# Altium PCB ASCII-v2.0.PcbDoc (part 3 of 5)
Units mil, origin at the board's own origin, x right, y up, seen from the top; angles counter-clockwise.
Board outline 1968.5 x 4921.26 mil, 4 copper layers (Top Layer, Layer 1, Layer 2, Bottom Layer), stack 62.45 mil thick; 272 components, 175 nets, 1155 pads, 394 vias.
Unrouted connection lines stored in the file: 146.
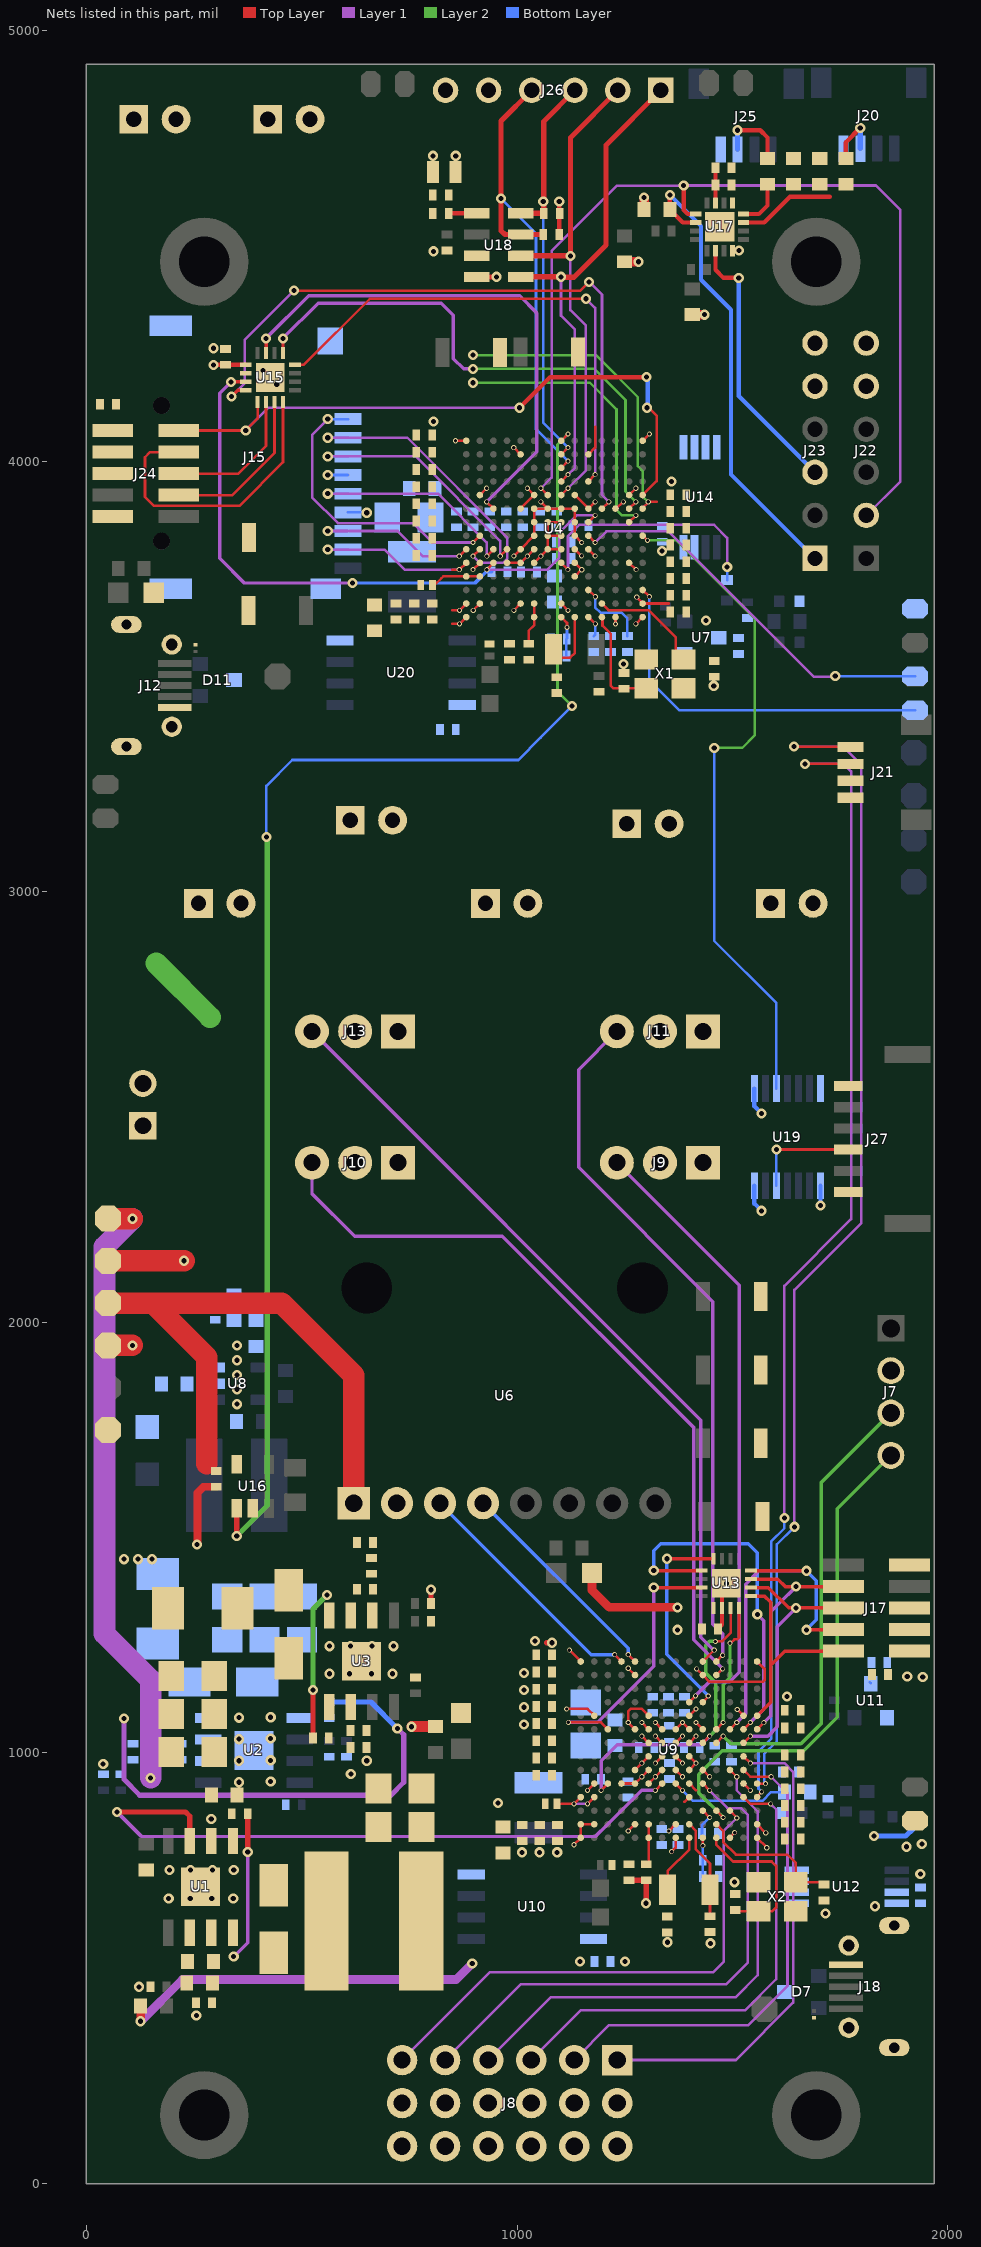
[diagram p4: the nets of this part, all layers, seen from the top]

## Part data (continued)
L3: library part SRN8040-1R0Y, "7.8A 1uH ±30% 11A SMD,7.9x8.2mm Power Inductors ROHS", LCSC Part Number=C2041438, Manufacturer=BOURNS, ComponentLink1Description=LCSC, ComponentLink1URL=https://www.lcsc.com/product-detail/Power-Inductors_BOURNS-SRN8040-1R0Y_C2041438.html, Manufacturer Part Number=SRN8040-1R0Y
L4: library part SMTDR54-120M, "1.4A 12uH ±20% SMD,5.2x5.8mm Power Inductors ROHS", LCSC Part Number=C326234, Manufacturer="3L COILS", ComponentLink1Description=LCSC, ComponentLink1URL=https://www.lcsc.com/product-detail/Power-Inductors_3L-COILS-SMTDR54-120M_C326234.html, Manufacturer Part Number=SMTDR54-120M
L5 L6: library part DFE322512F-4R7M=P2, "FIXED IND 4.7UH 1.6A 157MOHM SMD", LCSC Part Number=C703083, Manufacturer=Murata, Manufacturer Part Number=DFE322512F-4R7M=P2, Supplier Part Number 1=490-DFE322512F-4R7M=P2CT-ND, Category="Fixed Inductors", Item Type=Inductor, Pricing 1="1=0.61, 10=0.533, 25=0.4952, 50=0.4188, 100=0.3808, 250=0.35792, 500=0.31984, 1000=0.25892 (USD)", RoHS=Yes, RoHS Compliant=Yes, Stock 1=4687, Supplier 1=Digi-Key
LED1: "LED BLUE CLEAR 0805 SMD", Case Code (Imperial)=0805, Case Code (Metric)=2012, Color=Blue, Forward Current=30mA, Forward Voltage=3.2V, Lens Color=Colorless, Manufacturer="Wurth Electronics", Max Operating Temperature=85°C, Max Reverse Voltage (DC)=5V, Min Operating Temperature=-40°C, Package Quantity=1, Power Dissipation=105mW, Supplier Part Number=732-4982-1-ND, Test Current=20mA, Case/Package=0805, ComponentLink1Description=https://datasheet.ciiva.com/22656/1740214-22656954.pdf?src-supplier=Element14, ComponentLink1URL=https://datasheet.ciiva.com/22656/1740214-22656954.pdf?src-supplier=Element14, ComponentLink2Description=https://datasheet.ciiva.com/23843/150080bs75000-23843251.pdf?src-supplier=Newark, ComponentLink2URL=https://datasheet.ciiva.com/23843/150080bs75000-23843251.pdf?src-supplier=Newark, ComponentLink3Description=https://datasheet.ciiva.com/29279/759433-da-01-en-chipled-0805-w-kl-blau-150080bs75000-29279203.pdf?src-supplier=Conrad, ComponentLink3URL=https://datasheet.ciiva.com/29279/759433-da-01-en-chipled-0805-w-kl-blau-150080bs75000-29279203.pdf?src-supplier=Conrad, ComponentLink4Description=https://datasheet.ciiva.com/29562/150080bs75000-29562923.pdf?src-supplier=Digikey, ComponentLink4URL=https://datasheet.ciiva.com/29562/150080bs75000-29562923.pdf?src-supplier=Digikey, ComponentLink5Description=https://datasheet.ciiva.com/29562/150080bs75000-29562922.pdf?src-supplier=Digikey, ComponentLink5URL=https://datasheet.ciiva.com/29562/150080bs75000-29562922.pdf?src-supplier=Digikey, Dominant Wavelength=470nm, Height=0.8mm, Item Type=LEDs, Lead Free="Lead Free", Length=2mm, Lens Size=1.25mm, Lens Style=Clear,Flat,Rectangular, Lens Transparency=Clear, Luminous Intensity=145mcd, Manufacturer Part Number=150080BS75000, Mounting Technology="Surface Mount", Packaging="Cut Tape", Pricing="1=0.18, 50=0.176, 100=0.151, 500=0.131 (USD)", Reach SVHC Compliant=Unknown, Reverse Voltage=5V, RoHS=Yes, RoHS Compliant=Yes, Series=WL-SMCW, Stock=93649, Supplier=Digikey, Viewing Angle=140°, Wavelength=470nm, Width=1.25mm
LED2 LED3: library part XL-2012UOC, "Colorless transparence -30℃~+85℃ 601nm~603nm Positive post Orange 120° 55mW 0805 Light Emitting Diodes (LED) ROHS", LCSC Part no=C965813, Manufacturer=XINGLIGHT, Package=0805, Manufacture Part No=XL-2012UOC
R1: library part RT0603BRE07270RL, "RES SMD 270 OHM 0.1% 1/10W 0603", Case/Package=0603, LCSC Part Number=C705836, Manufacturer=Yageo, Max Operating Temperature=125°C, Max Power Dissipation=100mW, Min Operating Temperature=-55°C, Package Quantity=5000, Resistor Type="Thin Film", Supplier Part Number 1=RT0603BRE07270RL-ND, Temperature Coefficient=50ppm/°C, Tolerance=0.1%, Voltage Rating (DC)=50V, Category="Chip SMD Resistors", ComponentLink1Description=https://datasheet.ciiva.com/2584/pyu-rt-1-to-0-05-rohs-l-5-2584379.pdf?src-supplier=Digi-Key, ComponentLink1URL=https://datasheet.ciiva.com/2584/pyu-rt-1-to-0-05-rohs-l-5-2584379.pdf?src-supplier=Digi-Key, Construction=Rectangular, Depth=0.8mm, Height=0.022inch, Item Type=Resistor, Lead Free="Lead Free", Length=0.063inch, Manufacturer Part Number=RT0603BRE07270RL, Military Standard=Not, Number of Terminations=2, Packaging="Tape and Reel", Pricing 1="5000=0.04770 (USD)", Resistance=270R, RoHS=Yes, RoHS Compliant=Yes, Series=RT, Supplier 1=Digi-Key, Width=0.031inch
R2: library part CR0402FF1153G, "62.5mW Thick Film Resistors 50V ±1% ±200ppm/℃ 115kΩ 0402 Chip Resistor - Surface Mount ROHS", LCSC Part Number=C100215, Manufacturer="LIZ Elec", Package=0402, ComponentLink1Description=LCSC, ComponentLink1URL=https://www.lcsc.com/product-detail/Chip-Resistor-Surface-Mount_LIZ-Elec-CR0402FF1153G_C100215.html, Item Type=Resistor, Manufacturer Part Number=CR0402FF1153G
R3: library part NQ02WGF2872TCE, "62.5mW 100V ±1% 28.7kΩ 0402 Chip Resistor - Surface Mount ROHS", LCSC Part Number=C2779810, Manufacturer="Royal Ohm", Supplier Part Number=303-NQ02WGF2872TCE, Item Type=Resistor, Manufacturer Part Number=NQ02WGF2872TCE, Pricing="10000=0.002 (USD)", Supplier=Mouser
R4: library part RTT021053FTH, "62.5mW Thick Film Resistors 50V ±100ppm/℃ ±1% 105kΩ 0402 Chip Resistor - Surface Mount ROHS", LCSC Part Number=C102762, Manufacturer=RALEC, Package=0402, ComponentLink1Description=LCSC, ComponentLink1URL=https://www.lcsc.com/product-detail/Chip-Resistor-Surface-Mount_RALEC-RTT021053FTH_C102762.html, Item Type=Resistor, Manufacturer Part Number=RTT021053FTH
R5: library part RT0402BRD0712K1L, "RES SMD 12.1KOHM 0.1% 1/16W 0402", LCSC Part Number=C281773, Manufacturer=Yageo, Supplier Part Number=2068365, Category="Chip SMD Resistors", ComponentLink1Description=https://datasheet.ciiva.com/12812/pyu-rt-1-to-0-05-rohs-l-4-12812462.pdf?src-supplier=Mouser, ComponentLink1URL=https://datasheet.ciiva.com/12812/pyu-rt-1-to-0-05-rohs-l-4-12812462.pdf?src-supplier=Mouser, Item Type=Resistor, Manufacturer Part Number=RT0402BRD0712K1L, Pricing="10000=0.0245, 20000=0.0217, 30000=0.0237, 50000=0.0233, 100000=0.0228, 200000=0.022 (USD)", RoHS=Yes, Stock=60000, Supplier="Future Electronics"
R6: library part SCR0402F60K4, "60.4kΩ 50V 62.5mW Thick Film Resistors ±1% 0402 Chip Resistor - Surface Mount ROHS", LCSC Part Number=C3016055, Manufacturer=VO, Package=0402, ComponentLink1Description=LCSC, ComponentLink1URL=https://www.lcsc.com/product-detail/Chip-Resistor-Surface-Mount_VO-SCR0402F60K4_C3016055.html, Item Type=Resistor, Manufacturer Part Number=SCR0402F60K4
R7: library part RT0402BRD0723K7L, "RES SMD 23.7KOHM 0.1% 1/16W 0402", LCSC Part Number=C852656, Manufacturer=Yageo, Supplier Part Number=YAG4212CT-ND, Voltage Rating (DC)=50V, Category="Chip SMD Resistors", ComponentLink1Description=https://datasheet.ciiva.com/2582/pyu-rt-1-to-0-05-rohs-l-5-2582244.pdf?src-supplier=Digikey, ComponentLink1URL=https://datasheet.ciiva.com/2582/pyu-rt-1-to-0-05-rohs-l-5-2582244.pdf?src-supplier=Digikey, ComponentLink2Description=https://datasheet.ciiva.com/12725/pyu-rt-1-to-0-05-rohs-l-4-12725336.pdf?src-supplier=Mouser, ComponentLink2URL=https://datasheet.ciiva.com/12725/pyu-rt-1-to-0-05-rohs-l-4-12725336.pdf?src-supplier=Mouser, Item Type=Resistor, Manufacturer Part Number=RT0402BRD0723K7L, Pricing="1=0.16, 10=0.121, 50=0.0958, 100=0.0859, 500=0.0654, 1000=0.0578, 5000=0.04283 (USD)", RoHS=Yes, Stock=28530, Supplier=Digikey
R8: library part CRCW040280K6FKED, "RES SMD 80.6K OHM 1% 1/16W 0402", LCSC Part Number=C2076816, Manufacturer="Vishay Intertech", Package=Res-0402, Item Type=Resistor, Manufacturer Part Number=CRCW040280K6FKED
R9 R20: library part FRC0402F1152TS, "11.5kΩ 50V 62.5mW Thick Film Resistors ±100ppm/℃ ±1%  0402 Chip Resistor - Surface Mount ROHS", LCSC Part Number=C2933068, Manufacturer=FOJAN, Package=0402, ComponentLink1Description=LCSC, ComponentLink1URL=https://www.lcsc.com/product-detail/Chip-Resistor-Surface-Mount_FOJAN-FRC0402F1152TS_C2933068.html, Item Type=Resistor, Manufacturer Part Number=FRC0402F1152TS
R10 R11 R14 R15 R23 R24 R27 R29: library part RC0402FR-07100KL, "RES 100K OHM 1% 1/16W 0402", Case Code (Imperial)=0402, Case Code (Metric)=1005, LCSC Part Number=C60491, Manufacturer=Yageo, Max Operating Temperature=155°C, Max Power Dissipation=63mW, Min Operating Temperature=-55°C, Package Quantity=1, Resistance=100kR, Resistance Tolerance=1%, Resistor Type="Thick Film", Supplier Part Number 1=603-RC0402FR-07100KL, Temperature Coefficient=100ppm/°C, Voltage Rating=50V, Case/Package=0402, Category="Chip SMD Resistors", ComponentLink1Description=https://datasheet.ciiva.com/11819/0900766b80c66297-11819452.pdf?src-supplier=RSComponents, ComponentLink1URL=https://datasheet.ciiva.com/11819/0900766b80c66297-11819452.pdf?src-supplier=RSComponents, ComponentLink2Description=https://datasheet.ciiva.com/22747/1018594-22747509.pdf?src-supplier=Element14, ComponentLink2URL=https://datasheet.ciiva.com/22747/1018594-22747509.pdf?src-supplier=Element14, ComponentLink3Description=https://datasheet.ciiva.com/2453/pyu-r-int-thick-7-2453362.pdf?src-supplier=Digi-Key, ComponentLink3URL=https://datasheet.ciiva.com/2453/pyu-r-int-thick-7-2453362.pdf?src-supplier=Digi-Key, ComponentLink4Description=https://datasheet.ciiva.com/2453/pyu-r-int-thick-7-2453363.pdf?src-supplier=Digi-Key, ComponentLink4URL=https://datasheet.ciiva.com/2453/pyu-r-int-thick-7-2453363.pdf?src-supplier=Digi-Key, ComponentLink5Description=https://datasheet.ciiva.com/2453/pyu-r-int-thick-7-2453361.pdf?src-supplier=Digi-Key, ComponentLink5URL=https://datasheet.ciiva.com/2453/pyu-r-int-thick-7-2453361.pdf?src-supplier=Digi-Key, ComponentLink6Description=https://datasheet.ciiva.com/12667/pyu-rc0402-51-rohs-l-6-r-12667930.pdf?src-supplier=Mouser, ComponentLink6URL=https://datasheet.ciiva.com/12667/pyu-rc0402-51-rohs-l-6-r-12667930.pdf?src-supplier=Mouser, ComponentLink7Description=https://datasheet.ciiva.com/15189/getdatasheetpartid-323696-15189334.pdf?src-supplier=Verical, ComponentLink7URL=https://datasheet.ciiva.com/15189/getdatasheetpartid-323696-15189334.pdf?src-supplier=Verical, Construction=Rectangular, Depth=0.5mm, Features="Moisture Resistant", Height=0.016inch, Item Type=Resistor, Lead Free="Lead Free", Length=0.039inch, Manufacturer Part Number=RC0402FR-07100KL, Military Standard=Not, Number of Terminations=2, Packaging="Tape and Reel", Power Rating=63mW, Pricing 1="1=0.10000, 10=0.01200, 50=0.01200, 100=0.00500, 1000=0.00300, 2500=0.00200, 10000=0.00100 (USD)", REACH SVHC="No SVHC", RoHS=Yes, RoHS Compliant=Yes, Series=RC, Stock 1=7759549, Supplier 1=Mouser, Technology="THICK FILM", Termination=SMD/SMT, Tolerance=1%, Width=0.02inch, Working Voltage=50V
R12 R25: library part RC0603FR-071KL, "RES SMD 1K OHM 1% 1/10W 0603", Case Code (Imperial)=0603, Case Code (Metric)=1608, LCSC Part Number=C22548, Manufacturer=Yageo, Max Operating Temperature=155°C, Min Operating Temperature=-55°C, Power Rating=100mW, Resistance=1kR, Supplier Part Number 1=311-1.00KHRDKR-ND, Temperature Coefficient=100ppm/°C, Tolerance=1%, Voltage Rating=50V, Case/Package=0603, ComponentLink1Description=https://www.verical.com/server-webapp/html/getDatasheet?partID=409289&src-supplier=Verical, ComponentLink1URL=https://www.verical.com/server-webapp/html/getDatasheet?partID=409289&src-supplier=Verical, ComponentLink2Description=http://documents.rs-components.com/techlib://itc_doclist_GB.htm?stockno=5048928&src-supplier=RSComponents, ComponentLink2URL=http://documents.rs-components.com/techlib://itc_doclist_GB.htm?stockno=5048928&src-supplier=RSComponents, ComponentLink3Description=http://www.yageo.com/documents/recent/PYu-RC0603_51_RoHS_L_4.pdf?src-supplier=Avnet+Europe, ComponentLink3URL=http://www.yageo.com/documents/recent/PYu-RC0603_51_RoHS_L_4.pdf?src-supplier=Avnet+Europe, ComponentLink4Description=http://www.farnell.com/datasheets/2167052.pdf?src-supplier=Element14, ComponentLink4URL=http://www.farnell.com/datasheets/2167052.pdf?src-supplier=Element14, ComponentLink5Description=http://www.farnell.com/datasheets/1868787.pdf?src-supplier=Element14, ComponentLink5URL=http://www.farnell.com/datasheets/1868787.pdf?src-supplier=Element14, ComponentLink6Description=http://www.yageo.com/documents/recent/PYu-RC_Group_51_RoHS_L_2.pdf?src-supplier=Avnet, ComponentLink6URL=http://www.yageo.com/documents/recent/PYu-RC_Group_51_RoHS_L_2.pdf?src-supplier=Avnet, ComponentLink7Description=https://www.verical.com/server-webapp/html/getDatasheet?partID=404327&src-supplier=Verical, ComponentLink7URL=https://www.verical.com/server-webapp/html/getDatasheet?partID=404327&src-supplier=Verical, ComponentLink8Description=http://www.farnell.com/datasheets/443971.pdf?src-supplier=Element14, ComponentLink8URL=http://www.farnell.com/datasheets/443971.pdf?src-supplier=Element14, Composition="Thick Film", Contact Plating=Tin,Matte, Depth=0.8mm, Height=0.45mm, Item Type=Resistor, Lead Free="Lead Free", Length=1.6mm, Manufacturer Part Number=RC0603FR-071KL, Military Standard=Not, Packaging="Tape and Reel", Pricing 1="1=0.1, 10=0.023, 100=0.0094, 1000=0.0042, 2500=0.0037 (USD)", Radiation Hardening=No, REACH SVHC="No SVHC", Stock 1=21472395, Supplier 1=Digi-Key, Termination=SMD/SMT
R13 R26: library part RC0603FR-07130RL, "RES 130 OHM 1% 1/10W 0603", Case Code (Imperial)=0603, Case Code (Metric)=1608, LCSC Part Number=C141677, Manufacturer=Yageo, Max Operating Temperature=155°C, Max Power Dissipation=100mW, Min Operating Temperature=-55°C, Resistance Tolerance=1%, Resistor Type="Thick Film", Supplier Part Number 1=1846773, Temperature Coefficient=100ppm/°C, Voltage Rating=75V, Voltage Rating (DC)=50V, Case/Package=0603, Category="Chip SMD Resistors", ComponentLink1Description=https://datasheet.ciiva.com/46395/443971-46395023.pdf?src-supplier=Element14, ComponentLink1URL=https://datasheet.ciiva.com/46395/443971-46395023.pdf?src-supplier=Element14, ComponentLink2Description=https://datasheet.ciiva.com/2553/pyu-r-int-thick-7-2553516.pdf?src-supplier=Digi-Key, ComponentLink2URL=https://datasheet.ciiva.com/2553/pyu-r-int-thick-7-2553516.pdf?src-supplier=Digi-Key, ComponentLink3Description=https://datasheet.ciiva.com/2553/pyu-r-int-thick-7-2553517.pdf?src-supplier=Digi-Key, ComponentLink3URL=https://datasheet.ciiva.com/2553/pyu-r-int-thick-7-2553517.pdf?src-supplier=Digi-Key, ComponentLink4Description=https://datasheet.ciiva.com/2553/pyu-r-int-thick-7-2553515.pdf?src-supplier=Digi-Key, ComponentLink4URL=https://datasheet.ciiva.com/2553/pyu-r-int-thick-7-2553515.pdf?src-supplier=Digi-Key, Construction=Rectangular, Depth=0.8mm, Features="Moisture Resistant", Height=0.45mm, Item Type=Resistor, Lead Free="Lead Free", Length=1.6mm, Manufacturer Part Number=RC0603FR-07130RL, Military Standard=Not, Number of Terminations=2, Packaging="Tape and Reel", Pins=2, Power Rating=100mW, Pricing 1="5000=0.0014, 75000=0.0013, 200000=0.0013, 750000=0.0012, 2000000=0.0011 (USD)", Reach SVHC Compliant=No, RoHS=Yes, RoHS Compliant=Yes, Series=RC, Stock 1=630000, Supplier 1="Future Electronics", Termination=SMD/SMT, Tolerance=1%, Weight=7.1E-05oz, Width=0.8mm
R16: library part RLM10FTSMR006, "500mW 6mΩ ±50ppm/℃ ±1% 0805 Current Sense Resistors / Shunt Resistors ROHS", LCSC Part Number=C163092, Manufacturer="TA-I Tech", Package=0805, ComponentLink1Description=LCSC, ComponentLink1URL=https://www.lcsc.com/product-detail/Current-Sense-Resistors-Shunt-Resistors_TA-I-Tech-RLM10FTSMR006_C163092.html, Item Type=Resistor, Manufacturer Part Number=RLM10FTSMR006
R17: library part RC0603FR-0736K5L, "RES 36.5K OHM 1% 1/10W 0603", LCSC Part Number=C137738, Manufacturer=YAGEO, Package=0603, ComponentLink1Description=LCSC, ComponentLink1URL=https://www.lcsc.com/product-detail/Chip-Resistor-Surface-Mount_YAGEO-RC0603FR-0736K5L_C137738.html, Item Type=Resistor, Manufacturer Part Number=RC0603FR-0736K5L
R18: library part RC0603FR-0715K4L, "RES 15.4K OHM 1% 1/10W 0603", LCSC Part Number=C185370, Manufacturer=Yageo, Voltage Rating (DC)=50V, ComponentLink1Description=https://datasheet.ciiva.com/15159/getdatasheetpartid-28826-15159212.pdf?src-supplier=Verical, ComponentLink1URL=https://datasheet.ciiva.com/15159/getdatasheetpartid-28826-15159212.pdf?src-supplier=Verical, ComponentLink2Description=https://datasheet.ciiva.com/11808/0900766b80f96399-11808544.pdf?src-supplier=Rs, ComponentLink2URL=https://datasheet.ciiva.com/11808/0900766b80f96399-11808544.pdf?src-supplier=Rs, ComponentLink3Description=https://datasheet.ciiva.com/2454/pyu-r-int-thick-7-2454348.pdf?src-supplier=Digikey, ComponentLink3URL=https://datasheet.ciiva.com/2454/pyu-r-int-thick-7-2454348.pdf?src-supplier=Digikey, ComponentLink4Description=https://datasheet.ciiva.com/2454/pyu-r-int-thick-7-2454349.pdf?src-supplier=Digikey, ComponentLink4URL=https://datasheet.ciiva.com/2454/pyu-r-int-thick-7-2454349.pdf?src-supplier=Digikey, ComponentLink5Description=https://datasheet.ciiva.com/2454/pyu-r-int-thick-7-2454350.pdf?src-supplier=Digikey, ComponentLink5URL=https://datasheet.ciiva.com/2454/pyu-r-int-thick-7-2454350.pdf?src-supplier=Digikey, Item Type=Resistors, Lead Free=5697LeadFree, Manufacturer Part Number=RC0603FR-0715K4L, Pricing="5000=0.0022, 50000=0.0021, 150000=0.0021, 375000=0.002, 1000000=0.0019 (USD)", RoHS=Yes, RoHS Compliant=5897YesNo, Stock=230000, Supplier="Future Electronics"
R19: library part RC0603FR-0775KL, "RES 75K OHM 1% 1/10W 0603", Case Code (Imperial)=0603, Case Code (Metric)=1608, LCSC Part Number=C114636, Manufacturer=Yageo, Max Operating Temperature=155°C, Max Power Dissipation=100mW, Min Operating Temperature=-55°C, Resistance Tolerance=1%, Resistor Type="Thick Film", Temperature Coefficient=100ppm/°C, Voltage Rating=50V, Case/Package=0603, ComponentLink1Description=https://datasheet.ciiva.com/11808/0900766b80f96399-11808100.pdf?src-supplier=Rs, ComponentLink1URL=https://datasheet.ciiva.com/11808/0900766b80f96399-11808100.pdf?src-supplier=Rs, ComponentLink2Description=https://datasheet.ciiva.com/15189/getdatasheetpartid-326733-15189816.pdf?src-supplier=Verical, ComponentLink2URL=https://datasheet.ciiva.com/15189/getdatasheetpartid-326733-15189816.pdf?src-supplier=Verical, ComponentLink3Description=https://datasheet.ciiva.com/2455/pyu-r-int-thick-7-2455324.pdf?src-supplier=Digikey, ComponentLink3URL=https://datasheet.ciiva.com/2455/pyu-r-int-thick-7-2455324.pdf?src-supplier=Digikey, ComponentLink4Description=https://datasheet.ciiva.com/2455/pyu-r-int-thick-7-2455325.pdf?src-supplier=Digikey, ComponentLink4URL=https://datasheet.ciiva.com/2455/pyu-r-int-thick-7-2455325.pdf?src-supplier=Digikey, ComponentLink5Description=https://datasheet.ciiva.com/2455/pyu-r-int-thick-7-2455323.pdf?src-supplier=Digikey, ComponentLink5URL=https://datasheet.ciiva.com/2455/pyu-r-int-thick-7-2455323.pdf?src-supplier=Digikey, ComponentLink6Description=https://datasheet.ciiva.com/46395/443971-46395017.pdf?src-supplier=Element14, ComponentLink6URL=https://datasheet.ciiva.com/46395/443971-46395017.pdf?src-supplier=Element14, Construction=Rectangular, Depth=0.8mm, Features="Moisture Resistant", Height=0.45mm, Item Type=Resistor, Lead Free=5697LeadFree, Length=1.6mm, Manufacturer Part Number=RC0603FR-0775KL, Military Standard=Not, Number of Terminations=2, Packaging="Tape and Reel", Pins=2NUMBER, Power Rating=100mW, Pricing="5000=0.0015, 75000=0.0015, 250000=0.0014, 750000=0.0013, 2500000=0.0012 (USD)", Reach SVHC Compliant=No, RoHS=Yes, RoHS Compliant=Yes, Series=RC, Stock=550000, Supplier="Future Electronics", Technology="THICK FILM", Termination=SMD/SMT, Tolerance=1%, Voltage Rating (DC)=50V
R21: library part RC0402DR-07118KL, "RES 118K OHM 0.5% 1/16W 0402", Case/Package=0402, LCSC Part Number=C723573, Manufacturer=Yageo, Max Operating Temperature=155°C, Max Power Dissipation=63mW, Min Operating Temperature=-55°C, Resistance=118kR, Resistor Type="Thick Film", Supplier Part Number 1=603-RC0402DR-07118KL, Temperature Coefficient=100ppm/°C, Tolerance=0.5%, Category="Chip SMD Resistors", ComponentLink1Description=http://www.yageo.com.tw/exep/pages/download/literatures/PYu-R_INT-thick_7.pdf?src-supplier=Digi-Key, ComponentLink1URL=http://www.yageo.com.tw/exep/pages/download/literatures/PYu-R_INT-thick_7.pdf?src-supplier=Digi-Key, Features="Moisture Resistant", Height=0.016inch, Length=0.039inch, Manufacturer Part Number=RC0402DR-07118KL, Number of Terminations=2, Packaging="Tape and Reel", Pricing 1="1=0.21000, 10=0.07000, 50=0.07000, 100=0.02900, 1000=0.01300, 10000=0.01200 (USD)", RoHS=Yes, RoHS Compliant=Yes, Supplier 1=Mouser, Width=0.02inch
R22: library part RT0603BRD0713K3L, "RES SMD 13.3KOHM 0.1% 1/10W 0603", Case Code (Imperial)=0603, Case Code (Metric)=1608, LCSC Part Number=C861117, Manufacturer=Yageo, Max Operating Temperature=125°C, Max Power Dissipation=100mW, Min Operating Temperature=-55°C, Package Quantity=5000, Resistance=13.3kR, Resistor Type="Thin Film", Temperature Coefficient=25ppm/°C, Tolerance=0.1%, Voltage Rating=75V, Voltage Rating (DC)=50V, Case/Package=0603, Category="Chip SMD Resistors", ComponentLink1Description=https://datasheet.ciiva.com/12725/pyu-rt-1-to-0-05-rohs-l-4-12725067.pdf?src-supplier=Mouser, ComponentLink1URL=https://datasheet.ciiva.com/12725/pyu-rt-1-to-0-05-rohs-l-4-12725067.pdf?src-supplier=Mouser, ComponentLink2Description=https://datasheet.ciiva.com/8890/pyu-rt-1-to-0-05-rohs-l-4-8890934.pdf?src-supplier=Avnet, ComponentLink2URL=https://datasheet.ciiva.com/8890/pyu-rt-1-to-0-05-rohs-l-4-8890934.pdf?src-supplier=Avnet, ComponentLink3Description=https://datasheet.ciiva.com/2585/pyu-rt-1-to-0-05-rohs-l-4-2585661.pdf?src-supplier=Digi-Key, ComponentLink3URL=https://datasheet.ciiva.com/2585/pyu-rt-1-to-0-05-rohs-l-4-2585661.pdf?src-supplier=Digi-Key, ComponentLink4Description=https://datasheet.ciiva.com/46635/pyu-rt-1-to-0-05-rohs-l-5-46635007.pdf?src-supplier=Digi-Key, ComponentLink4URL=https://datasheet.ciiva.com/46635/pyu-rt-1-to-0-05-rohs-l-5-46635007.pdf?src-supplier=Digi-Key, Construction=Rectangular, Contact Plating=Tin,Matte, Depth=0.8mm, Features="Moisture Resistant", Height=0.022inch, Item Type=Resistor, Lead Free="Lead Free", Length=0.063inch, Manufacturer Part Number=RT0603BRD0713K3L, Military Standard=Not, Number of Terminations=2, Packaging="Tape and Reel", Power Rating=100mW, Pricing 1="1=0.29220, 10=0.24060, 25=0.23820, 100=0.10400, 250=0.10250, 500=0.10060, 1000=0.06040, 3000=0.04000 (USD)", Radiation Hardening=No, RoHS=Yes, RoHS Compliant=Yes, Series=RT, Stock 1=4750, Supplier 1="Arrow Electronics", Supplier Part Number 1=RT0603BRD0713K3L, Termination=SMD/SMT, Width=0.031inch
R28: library part RC0603FR-071ML, "RES SMD 1M OHM 1% 1/10W 0603", Case Code (Imperial)=0603, Case Code (Metric)=1608, LCSC Part Number=C105578, Manufacturer=Yageo, Max Operating Temperature=155°C, Min Operating Temperature=-55°C, Package Quantity=5000, Power Rating=100mW, Resistance=1MR, Supplier Part Number 1=311-1.00MHRDKR-ND, Temperature Coefficient=100ppm/°C, Tolerance=1%, Voltage Rating=50V, Case/Package=0603, ComponentLink1Description=http://www.farnell.com/datasheets/2167052.pdf?src-supplier=Mouser, ComponentLink1URL=http://www.farnell.com/datasheets/2167052.pdf?src-supplier=Mouser, ComponentLink2Description=http://www.farnell.com/datasheets/2167052.pdf?src-supplier=Element14, ComponentLink2URL=http://www.farnell.com/datasheets/2167052.pdf?src-supplier=Element14, ComponentLink3Description=http://documents.rs-components.com/techlib://itc_doclist_GB.htm?stockno=5048956&src-supplier=RSComponents, ComponentLink3URL=http://documents.rs-components.com/techlib://itc_doclist_GB.htm?stockno=5048956&src-supplier=RSComponents, Composition="Thick Film", Depth=0.8mm, Height=0.45mm, Item Type=Resistor, Lead Free="Lead Free", Length=1.6mm, Manufacturer Part Number=RC0603FR-071ML, Military Standard=Not, Number of Pins=2, Packaging="Tape and Reel", Pricing 1="1=0.1, 10=0.023, 100=0.0094, 1000=0.00421, 2500=0.00366 (USD)", REACH SVHC="No SVHC", Stock 1=3824601, Supplier 1=Digi-Key, Termination=SMD/SMT, Voltage Rating (DC)=50V, Width=0.8mm
SB1 SB2 SB3 SB4 SB5 SB6 SB7: "Solder Bridge ON", Manufacturer Part Number="Solder Bridge", Item Type="Solder Bridge"
SW1 SW2 SW3 SW4 SW5 SW6 SW7 SW8: "SWITCH TACTILE SPST-NO 0.05A 12V", Contact Current Rating=50mA, Contact Resistance=100mR, Insulation Resistance=100MR, LCSC Part Number=C231329, Manufacturer=Omron, Max Operating Temperature=70°C, Max Voltage Rating (DC)=12V, Min Operating Temperature=-25°C, Operating Force=1.5N, Package Quantity=1, Ratings="Dust Proof,IP40", Supplier Part Number 1=SW1020DKR-ND, Actuator Length=0.4mm, Actuator Type=Standard, ComponentLink1Description=http://www.farnell.com/datasheets/60838.pdf?src-supplier=Farnell, ComponentLink1URL=http://www.farnell.com/datasheets/60838.pdf?src-supplier=Farnell, ComponentLink2Description=http://www.farnell.com/datasheets/60838.pdf?src-supplier=Element14, ComponentLink2URL=http://www.farnell.com/datasheets/60838.pdf?src-supplier=Element14, ComponentLink3Description=https://omronfs.omron.com/en_US/ecb/products/pdf/en-b3u.pdf?src-supplier=Digi-Key, ComponentLink3URL=https://omronfs.omron.com/en_US/ecb/products/pdf/en-b3u.pdf?src-supplier=Digi-Key, ComponentLink4Description=http://www.omron.com/ecb/products/pdf/en-b3u.pdf?src-supplier=Digi-Key, ComponentLink4URL=http://www.omron.com/ecb/products/pdf/en-b3u.pdf?src-supplier=Digi-Key, ComponentLink5Description=https://www.distrelec.biz/Web/Downloads/he/et/B3U_eng_datasheet.pdf?mime=application%2Fpdf&src-supplier=Distrelec, ComponentLink5URL=https://www.distrelec.biz/Web/Downloads/he/et/B3U_eng_datasheet.pdf?mime=application%2Fpdf&src-supplier=Distrelec, ComponentLink6Description=http://www.onlinecomponents.com/productFiles/mf-OM/en-b3u.pdf?src-supplier=Onlinecomponents.com, ComponentLink6URL=http://www.onlinecomponents.com/productFiles/mf-OM/en-b3u.pdf?src-supplier=Onlinecomponents.com, ComponentLink7Description=https://www.verical.com/server-webapp/html/getDatasheet?partID=552554&src-supplier=Verical, ComponentLink7URL=https://www.verical.com/server-webapp/html/getDatasheet?partID=552554&src-supplier=Verical, ComponentLink8Description=http://www.farnell.com/datasheets/1685550.pdf?src-supplier=Element14, ComponentLink8URL=http://www.farnell.com/datasheets/1685550.pdf?src-supplier=Element14, ComponentLink9Description=http://www.farnell.com/datasheets/2610940.pdf?src-supplier=Farnell, ComponentLink9URL=http://www.farnell.com/datasheets/2610940.pdf?src-supplier=Farnell, ComponentLink10Description=https://www.alliedelec.com/m/d/4c8a9ef82804fc3c241a13c1e298fd73.pdf?src-supplier=Allied+Electronics, ComponentLink10URL=https://www.alliedelec.com/m/d/4c8a9ef82804fc3c241a13c1e298fd73.pdf?src-supplier=Allied+Electronics, Contact Material=Silver, Current Rating=50mA, Depth=2.5mm, Electrical Life=200000Cycles, Height=1.2mm, Illumination Type=Non-Illuminated,Illuminated, Item Type=Switch, Lead Free="Lead Free", Length=4mm, Manufacturer Part Number=B3U-1000P, Max Current Rating=50mA, Mechanical Life=200000Cycles, Mount="Surface Mount", Orientation=Straight, Packaging="Tape and Reel", Pricing 1="1=1, 10=0.961, 25=0.9064, 50=0.7976, 100=0.7251, 250=0.68888, 500=0.67074, 1000=0.52571 (USD)", REACH SVHC=Unknown, Stock 1=116454, Supplier 1=Digi-Key, Switch Function=Off-Mom, Switch Travel=0.15mm, Termination=SMD/SMT, Throw Configuration=SPST, Voltage Rating (DC)=12V, Weight=0.000776oz, Width=3mm
TP1 TP2 TP10 TP11 TP12 TP13 TP15: "Wire Connecting Pad", Item Type="Test Point", Manufacturer Part Number="2 Test Pad"
TP3 TP4 TP5 TP6 TP7 TP8 TP9 TP14: "Test Point ON", Item Type="TEST POINT"
U1 U2 U3: "IC REG BCK SPLIT RAIL ADJ 8SOPWR", LCSC Part Number=C31966, Manufacturer="Texas Instruments", Supplier Part Number=595-TPS54560DDAR, ComponentLink1Description=https://datasheet.ciiva.com/15082/tps54560-15082015.pdf?src-supplier=Digikey, ComponentLink1URL=https://datasheet.ciiva.com/15082/tps54560-15082015.pdf?src-supplier=Digikey, ComponentLink2Description=https://datasheet.ciiva.com/30031/tps54560-30031578.pdf?src-supplier=Avnet, ComponentLink2URL=https://datasheet.ciiva.com/30031/tps54560-30031578.pdf?src-supplier=Avnet, ComponentLink3Description=https://datasheet.ciiva.com/29739/tps54560-29739549.pdf?src-supplier=Digikey, ComponentLink3URL=https://datasheet.ciiva.com/29739/tps54560-29739549.pdf?src-supplier=Digikey, Item Type="Voltage Regulators - Switching", Manufacturer Part Number=TPS54560DDAR, Pricing="1=4.48, 10=3.93, 50=3.93, 100=3.6, 1000=2.75, 10000=2.67 (USD)", RoHS=Yes, Stock=12707, Supplier=Mouser
U4 U9: "IC MCU 32BIT EXT MEM 196LFBGA", Manufacturer="NXP Semiconductors", Supplier Part Number=568-MIMXRT1062DVJ6B-ND, Category=Uncategorized, Manufacturer Part Number=MIMXRT1062DVJ6B, Pricing="1=15.93, 10=12.734, 189=10.75497, 567=10.68896, 945=10.09187 (USD)", RoHS=Yes, Stock=1142, Supplier=Digi-Key
U6: "GY-521 6DOF 3 Axis Analog Gyro Sensor + 3 Axis Accelerometer Module", Manufacturer Part Number=MPU6050, Contributor=jofenix, spicePre=U, spiceSymbolName="MPU6050 MODULE", Supplier=Aliexpress
U7 U11: "3-Pin uP Reset Circuits with Ope", LCSC Part Number=C620009, Manufacturer="Union Semiconductor", Item Type=IC, Manufacturer Part Number=UM803RS, Pricing="1=0.1121 (USD)", RoHS=No, Stock=2840, Supplier="Arrow Electronics", Supplier Part Number=UM803RS
U8: "IC REG BOOST ADJ 1.8A SOT23-5", Case/Package=SOT-23-5, LCSC Part Number=C468235, Manufacturer="TI National Semiconductor", Max Operating Temperature=125°C, Max Output current=1.4A, Max Output Voltage=20V, Max Supply Voltage=14V, Min Input Voltage=2.7V, Min Operating Temperature=-40°C, Min Output Voltage=3V, Output Current=1.8A, Package Quantity=3000, Quiescent Current=2mA, Supplier Part Number 1=926-LMR62014XMFXNOPB, Switching Frequency=1.6MHz, Category="Voltage Regulators - Switching", ComponentLink1Description=http://www.ti.com/lit/ds/symlink/lmr62014.pdf?src-supplier=Farnell, ComponentLink1URL=http://www.ti.com/lit/ds/symlink/lmr62014.pdf?src-supplier=Farnell, ComponentLink2Description=http://www.ti.com/lit/ds/symlink/lmr62014.pdf?src-supplier=Digi-Key, ComponentLink2URL=http://www.ti.com/lit/ds/symlink/lmr62014.pdf?src-supplier=Digi-Key, ComponentLink3Description=http://www.ti.com/lit/gpn/lmr62014?src-supplier=Mouser, ComponentLink3URL=http://www.ti.com/lit/gpn/lmr62014?src-supplier=Mouser, ComponentLink4Description=http://www.ti.com/general/docs/lit/getliterature.tsp?genericPartNumber=LMR62014&&fileType=pdf&src-supplier=Avnet, ComponentLink4URL=http://www.ti.com/general/docs/lit/getliterature.tsp?genericPartNumber=LMR62014&&fileType=pdf&src-supplier=Avnet, ComponentLink5Description=http://components.arrow.com/part/dataview/56704644S382285N1317?src-supplier=Arrow+Electronics, ComponentLink5URL=http://components.arrow.com/part/dataview/56704644S382285N1317?src-supplier=Arrow+Electronics, Contact Plating=Tin,Matte, Item Type=IC, Lead Free="Lead Free", Manufacturer Part Number=LMR62014XMFX/NOPB, Mounting Technology="Surface Mount", Number of Outputs=1, Output Configuration=Positive, Output Type=Adjustable, Output Voltage=20V, Packaging="Tape and Reel", Pins=5, Pricing 1="1=0.96000, 10=0.86100, 50=0.81700, 100=0.67100, 1000=0.43800, 10000=0.39800 (USD)", Radiation Hardening=No, RoHS=Yes, RoHS Compliant=Yes, Series="SIMPLE SWITCHER®", Stock 1=7014, Supplier 1=Mouser, Synchronous Rectifier=No, Topology=Boost
U10 U20: "IC FLASH 64MBIT SPI/QUAD 8SOIC", Case/Package=SOIC, Frequency=133MHz, LCSC Part Number=C5362615, Manufacturer=Winbond, Max Operating Temperature=85°C, Min Operating Temperature=-40°C, Supplier Part Number=1882666P, Category=Flash, ComponentLink1Description=http://www.winbond.com/resource-files/w25q64jv%20revj%2003272018%20plus.pdf?src-supplier=Digi-Key, ComponentLink1URL=http://www.winbond.com/resource-files/w25q64jv%20revj%2003272018%20plus.pdf?src-supplier=Digi-Key, Item Type=IC, Manufacturer Part Number=W25Q64JVSSIM, Memory Format=Non-Volatile,FLASH, Memory Size=64Mb, Mounting Technology="Surface Mount", Packaging=Rail/Tube, Pricing="20=0.818, 50=0.796, 100=0.776, 250=0.756 (GBP)", RoHS=Yes, RoHS Compliant=Yes, Series=SpiFlash®, Stock=300, Supplier=Rs
U12 U14: "IC EEPROM 64KBIT I2C 1MHZ 8TSSOP", LCSC Part Number=C222148, Manufacturer=STMicroelectronics, Package=TSSOP-8, Supplier Part Number=497-15760-2-ND, Category=EEPROM, ComponentLink1Description=LCSC, ComponentLink1URL=https://www.lcsc.com/product-detail/EEPROM_STMicroelectronics-M24C64-FDW6TP_C222148.html, ComponentLink2Description=https://datasheet.ciiva.com/26942/getdatasheetpartid-785735-26942181.pdf?src-supplier=Verical, ComponentLink2URL=https://datasheet.ciiva.com/26942/getdatasheetpartid-785735-26942181.pdf?src-supplier=Verical, ComponentLink3Description=https://datasheet.ciiva.com/6617/cd00259166-6617416.pdf?src-supplier=Digikey, ComponentLink3URL=https://datasheet.ciiva.com/6617/cd00259166-6617416.pdf?src-supplier=Digikey, Item Type=IC, Manufacturer Part Number=M24C64-FDW6TP, Pricing="4000=0.23401, 8000=0.22895, 12000=0.22493, 28000=0.21957 (USD)", RoHS=Yes, Stock=12000, Supplier=Digikey
U13 U15: "IC MCU 32BIT 32KB FLASH 16QFN", Manufacturer="NXP USA", Supplier Part Number=49X9712, Manufacturer Part Number=MKL02Z32VFG4, RoHS=No, Supplier=Newark
U16: "IC CURRENT MONITOR SOT25", LCSC Part Number=C154866, Manufacturer=Diodes, ComponentLink1Description=https://datasheet.ciiva.com/1484/1383709-1484867.pdf?src-supplier=Element14, ComponentLink1URL=https://datasheet.ciiva.com/1484/1383709-1484867.pdf?src-supplier=Element14, Item Type=IC, Manufacturer Part Number=ZXCT1086E5TA, Pricing="3000=0.69, 6000=0.665 (USD)", RoHS=Yes, Stock=9000, Supplier="Future Electronics"
U17: "QFN-16-EP(3x3) 3D Magnetic Sensors ROHS", LCSC Part Number=C2654971, Manufacturer=Melexis, Package=QFN-16-EP(3x3), Item Type=IC, Manufacturer Part Number=MLX90393ELW-ABA-011-RE
U18: "50Kpa~110Kpa LGA-8(3x5) Pressure Sensors ROHS", LCSC Part Number=C54429, Manufacturer="NXP Semicon", Package=LGA-8(3x5), ComponentLink1Description=LCSC, ComponentLink1URL=https://www.lcsc.com/product-detail/Pressure-Sensors_NXP-Semicon-MPL3115A2R1_C54429.html, Item Type=IC, Manufacturer Part Number=MPL3115A2R1
U19: "IC TRANSLATOR BIDIR 14TSSOP", Case/Package=TSSOP, High Level Output Current=-20uA, LCSC Part Number=C60708, Low Level Output Current=20uA, Manufacturer="Texas Instruments", Max Operating Temperature=85°C, Max Supply Voltage=5.5V, Min Operating Temperature=-40°C, Min Supply Voltage=1.2V, Nominal Supply Current=5uA, Package Quantity=2000, Quiescent Current=3.5uA, Category="Voltage Level Shifters", Channel Type=Bidirectional, ComponentLink1Description=https://datasheet.ciiva.com/1508/1633692-1508723.pdf?src-supplier=Element14, ComponentLink1URL=https://datasheet.ciiva.com/1508/1633692-1508723.pdf?src-supplier=Element14, ComponentLink2Description=https://datasheet.ciiva.com/22653/1845221-22653354.pdf?src-supplier=Farnell, ComponentLink2URL=https://datasheet.ciiva.com/22653/1845221-22653354.pdf?src-supplier=Farnell, ComponentLink3Description=https://datasheet.ciiva.com/15096/getdatasheetpartid-48026-15096134.pdf?src-supplier=Verical, ComponentLink3URL=https://datasheet.ciiva.com/15096/getdatasheetpartid-48026-15096134.pdf?src-supplier=Verical, ComponentLink4Description=https://datasheet.ciiva.com/1508/1849862-1508724.pdf?src-supplier=Element14, ComponentLink4URL=https://datasheet.ciiva.com/1508/1849862-1508724.pdf?src-supplier=Element14, ComponentLink5Description=https://datasheet.ciiva.com/46395/1864432-46395886.pdf?src-supplier=Element14, ComponentLink5URL=https://datasheet.ciiva.com/46395/1864432-46395886.pdf?src-supplier=Element14, ComponentLink6Description=https://datasheet.ciiva.com/1899/txb0104-1899515.pdf?src-supplier=Digi-Key, ComponentLink6URL=https://datasheet.ciiva.com/1899/txb0104-1899515.pdf?src-supplier=Digi-Key, ComponentLink7Description=https://datasheet.ciiva.com/1899/txb0104-1899514.pdf?src-supplier=Digi-Key, ComponentLink7URL=https://datasheet.ciiva.com/1899/txb0104-1899514.pdf?src-supplier=Digi-Key, ComponentLink8Description=https://datasheet.ciiva.com/1899/txb0104-1899516.pdf?src-supplier=Digi-Key, ComponentLink8URL=https://datasheet.ciiva.com/1899/txb0104-1899516.pdf?src-supplier=Digi-Key, ComponentLink9Description=https://datasheet.ciiva.com/14287/txb0104-14287375.pdf?src-supplier=Avnet, ComponentLink9URL=https://datasheet.ciiva.com/14287/txb0104-14287375.pdf?src-supplier=Avnet, Data Rate=100Mbps, Height=1.15mm, Item Type=IC, Lead Free="Lead Free", Length=5mm, Logic Function=Translator, Manufacturer Part Number=TXB0104PWR, Mount="Surface Mount", Number of Bits=4, Number of Channels=4, Number of Circuits=1, Number of Inputs=4, Number of Pins=14, Output Current=20uA, Output Type=3-STATE, Packaging="Tape and Reel", Pricing 1="1=1.50780, 10=1.39060, 25=1.29340, 100=1.11370, 250=1.03790, 500=0.97230, 1000=0.92410 (USD)", Propagation Delay=31ns, Radiation Hardening=No, Reach SVHC Compliant=Yes, RoHS=Yes, RoHS Compliant=Yes, Series=-, Stock 1=1658, Supplier 1="Arrow Electronics", Supplier Part Number 1=TXB0104PWR, Turn-On Delay Time=7.4ns, Weight=0.002018oz, Width=4.4mm
X1 X2: library part X322524MOB4SI, "24MHz SMD Crystal Resonator 12pF ±10ppm ±30ppm -40℃~+85℃ SMD3225-4P Crystals ROHS", LCSC Part Number=C70590, Manufacturer="Yangxing Tech", ComponentLink1Description=LCSC, ComponentLink1URL=https://www.lcsc.com/product-detail/Crystals_Yangxing-Tech-X322524MOB4SI_C70590.html, Item Type=Crystal, Manufacturer Part Number=X322524MOB4SI
X3 X4: library part NX3215SA-32.768K-STD-MUA-8, "CRYSTAL 32.7680KHZ 12.5PF SMD", Case/Package=SMD/SMT, ESR (Equivalent Series Resistance)=70kR, Frequency=32.768kHz, Frequency Tolerance=20ppm, LCSC Part Number=C156245, Load Capacitance=12.5pF, Manufacturer=NDK, Max Operating Temperature=85°C, Min Operating Temperature=-40°C, Package Quantity=1000, Supplier Part Number 1=644-1156-6-ND, ComponentLink1Description=https://media.digikey.com/pdf/Data%20Sheets/NDK%20PDFs/NX3215SA-32.768K-STD-MUA-8.pdf?src-supplier=Digi-Key, ComponentLink1URL=https://media.digikey.com/pdf/Data%20Sheets/NDK%20PDFs/NX3215SA-32.768K-STD-MUA-8.pdf?src-supplier=Digi-Key, ComponentLink2Description=http://www.ndk.com/images/products/catalog/c_NX3215SA-STD-MUA-14_e.pdf?src-supplier=Digi-Key, ComponentLink2URL=http://www.ndk.com/images/products/catalog/c_NX3215SA-STD-MUA-14_e.pdf?src-supplier=Digi-Key, Height=0.035inch, Lead Free="Lead Free", Length=0.126inch, Manufacturer Part Number=NX3215SA-32.768K-STD-MUA-8, Mount="Surface Mount", Number of Pins=2, Packaging="Tape and Reel", Pricing 1="1=0.68, 10=0.602, 50=0.5628, 100=0.4974, 500=0.47124, 1000=0.3927 (USD)", Stock 1=29951, Supplier 1=Digi-Key, Width=0.059inch

## Free pads (board coordinates)
  round 204.72 hole 118.11: MH(273.52,159) MH(273.52,4462.89) MH(1694.98,4462.89) MH(1694.98,159)

## Via types
v1: diameter 23.62, hole 11.81, Top Layer to Bottom Layer, tented both sides, 119 vias
v2: diameter 23.62, hole 11.81, Top Layer to Bottom Layer, 104 vias
v3: diameter 11.81, hole 7.87, Top Layer to Bottom Layer, 89 vias
v4: diameter 11.81, hole 7.87, Top Layer to Bottom Layer, tented both sides, 82 vias

## Nets (pads, with @x,y where several pads share a name; then routed paths per layer and width w, separated by ;. In a path a pad name is that pad's centre, name@x,y a point inside that pad or via, vN(x,y) a via of type N, cw(c..) or ccw(c..) an arc to the next point about the centre after c; other vN are vias at no path point)
3.3V: U19.1 U19.8 | length 110.7
  Bottom Layer w10: U19.1@1551.23,2542.99 1551.23,2501.77 v2(1568,2485) ; v2(1704.77,2271.23) U19.8@1704.77,2317.01
3V3: C4.2 C23.2 C37.2 C38.2 C39.2 C40.2 C41.2 C42.2 C43.2 C44.2 C45.2 C46.2 C47.2 C48.2 C49.2 C50.2 C51.2 C52.2 C53.2 C54.2 C55.2 C60.2 C80.2 C84.2 C85.2 C86.2 C87.2 C88.2 C89.2 C90.2 C91.2 C92.2 C93.2 C94.2 C95.2 C96.2 C97.2 C98.2 C99.2 C100.2 C101.2 C106.2 C126.2 C127.2 C128.2 C129.2 C130.2 C131.1 C132.2 C133.2 D8.1 D12.1 FB2.1 FB4.1 J5.1 J15.4 J17.1 J19.1 J20.2 J21.2 J22.5 J23.5 J24.1 J25.2 J26.5 L3.2 LED2.1 LED3.1 R17.2 R27.2 R29.2 SB1.1 SB2.1 SB3.1 SB5.1 SB7.1 TP7.1 U4.E6 U4.E9 U4.F5 U4.F10 U4.J6 U4.J10 U4.K4 U4.K5 U4.N14 U4.P12 U6.1 U7.3 U9.E6 U9.E9 U9.F5 U9.F10 U9.J6 U9.J10 U9.K4 U9.K5 U9.N14 U9.P12 U10.8 U11.3 U12.8 U13.1 U14.8 U15.1 U16.5 U17.8 U17.15 U18.1 U18.4 U20.8 | length 4040.5
  Top Layer w6: U4.K4@976.74,3763.76 U4.K5@1008.23,3763.76 v3(1023.98,3779.5) U4.J6@1039.73,3795.25 ; U4.F5@1008.23,3889.74 U4.E6@1039.73,3921.24 v3(1023.98,3936.98) ; U4.E9@1134.22,3921.24 U4.F10@1165.71,3889.74 v3(1181.46,3905.49) ; U4.J10@1165.71,3795.25 v3(1181.46,3779.59) ; v3(1228.7,3621.79) U4.P12@1228.7,3637.77 ; U9.K4@1242.51,929.02 U9.K5@1274.01,929.02 ; U9.K5@1274.01,929.02 v4(1289.76,944.77) U9.J6@1305.5,960.52 ; U9.F5@1274.01,1055.01 v4(1258.26,1070.76) 1258.5,1071 1258.5,1097.01 1263.75,1102.25 1289.76,1102.25 U9.E6@1305.5,1086.5 ; v3(1278,3684) 1291.7,3670.3 U4.N14@1291.7,3669.27 ; U4.N14@1292.73,3669.27 1352.31,3669.27 ; U9.E9@1399.99,1086.5 v4(1415.74,1102.25) ; v4(1415.74,1070.76) U9.F10@1431.49,1055.01 ; U9.J10@1431.49,960.52 v4(1447.24,944.77) ; U9.P12@1494.48,803.04 1494.48,803.98 v4(1505.5,815.01) ; U9.N14@1557.47,834.54 v4(1577.5,814.5)
  Top Layer w10: v2(295.53,4223.53) U15.1@369.91,4223.53 ; C133.2@845.57,4575.43 U18.1@906.64,4575.43 ; v2@951.79,4427.79 v2(952,4428) ; R27.2@1098,4526 v2(1098,4603) ; U17.15@1460.74,4599.57 C130.2@1460.74,4681.03 ; U17.8@1500.12,4488.74 v2(1515.74,4488.74) ; v2(1512.32,4768.32) 1564.68,4768.32 1581.67,4751.33 SB5.1@1581.67,4703 ; SB7.1@1763.67,4703 1763.67,4740.67 v2@1797,4774
  Top Layer w12: U18.4@906.64,4427.79 v2@951.79,4427.79 ; 1069,1256 v1(1081,1256) ; v1@1621,1131 v1(1626.81,1131)
  Top Layer w20: v1(126,377) R17.2@126,412 ; LED2.1@1174,1418 1174,1378 1214,1338 v1(1373,1338)
  Top Layer w22: SB2.1@1250,4463 v2(1282,4463) ; SB1.1@1295,4584 v2(1295,4612) ; SB3.1@1407,4340 v2(1435,4340)
  Top Layer w50: TP7.1@50,2044.6 106.6,2044.6 ; 107,2044.2 154.8,2044.2 ; 280,1672 280,1919 154.8,2044.2 ; U6.1@621,1580 621,1877 453.8,2044.2 154.8,2044.2
  Layer 1 w20: v1(126,377) 223,474 859,474 v1(896,511)
  Bottom Layer w6: v2(560.57,3967.66) J15.4@607.54,3967.66 ; U11.3@1819.5,1164.01 U11.3@1821.5,1162.01
  Bottom Layer w10: J20.2@1797,4726.02 J20.2@1797.32,4725.7
  Bottom Layer w12: J25.2@1512.32,4723.74 v2@1512.32,4773.32 ; J20.2@1797,4726.02 v2@1797,4774 ; v1(1829,807) 1853.99,807.01 1902.5,807.01 1919.24,823.75 D8.1@1919.24,852.02
  other v1: 1146,516 1831.5,644.01 956,884 1942.28,1176.29 1906.28,1177.29 1373,1286
  other v2: 1439,3630 1337,3791 1359,3953 806.25,4091.77 857.76,4709 1797,4773.32
3V3_ENABLE: U1.3 U9.K7 | length 1571.5
  Top Layer w6: v4(1321.25,913.28) U9.K7@1337,929.02
  Top Layer w12: v1(71,863) 230.23,863 240.11,853.12 U1.3@240.11,795.42
  Layer 1 w8: v1(71,863) 128,806 1182,806 1210.79,834.79 1289.28,913.28 v4(1321.25,913.28)
5V: C3.2 C15.2 C21.2 C22.2 J1.1 J2.1 J4.1 J6.1 J8.2 J8.5 J8.8 J8.11 J8.14 J8.17 J11.1 J13.1 J27.6 L2.2 R6.2 TP6.1 U1.2 U19.14 | length 1523.4
  Top Layer w12: R6.2@800,1347 v1(800,1379)
  Top Layer w50: TP6.1@50,2241 v1@106.6,2241
  Layer 1 w50: v1(107,2240.6) 42,2175.6 42,1277 149,1170 v1(149,942)
  Bottom Layer w10: U19.14@1551.23,2317.01 1551.23,2275.79 v2(1568,2259.02)
  other v1: 290,847
8V4: C7.2 C8.2 C9.2 C13.2 C14.2 J3.1 J4.2 J9.1 J10.1 L1.2 R1.2 R2.2 TP5.1 U3.2 | length 232.7
  Top Layer w25: v1@755.34,1061.34 R1.2@811,1061.34
  Top Layer w50: TP5.1@50,2142.8 v1@227,2142.8
  other v1: 614,951 38.97,974.73 755,1061 87,1450 119.5,1450 152,1450 227,2143
12V: C27.2 C28.2 D5.2 J16.1 R21.2 TP3.1 | length 233.4
  Top Layer w50: TP3.1@50,1946.4 v1@106.6,1946.4
  Layer 2 w50: 162,2834 287,2709
  other v1: 107,1946
A0: SB4.1 SB5.2 U17.12 | length 113.3
  Top Layer w10: U17.12@1526,4573.69 1561.68,4573.69 1581.67,4593.67 SB5.2@1581.67,4643
A1: SB6.1 SB7.2 U17.11 | length 224.9
  Top Layer w10: U17.11@1526,4554 1574,4554 1634,4614 1726,4614
A10: J13.3 U9.A10 | length 1861.8
  Top Layer w6: U9.A10@1431.76,1212.49 1458,1238.73 v4(1458.01,1239)
  Layer 1 w8: J13.3@523.92,2675.7 1427,1772.62 1427,1268.67 1453.58,1242.09 1453.89,1242.09 1456.98,1239 v4(1458.01,1239)
A11: J11.3 U9.A11 | length 1644.6
  Top Layer w6: U9.A11@1462.98,1212.49 v4(1477.49,1226.99)
  Layer 1 w8: J11.3@1231.91,2675.7 1143,2586.79 1143,2360 1454.81,2048.19 1454.81,1989.88 1454.81,1838.45 1454.81,1819.55 1454.81,1299.17 1477.49,1276.49 v4(1477.49,1226.99)
B11: J10.3 U9.B11 | length 1791.6
  Top Layer w6: U9.B11@1462.98,1180.99 v4(1477.49,1195.5)
  Layer 1 w8: J10.3@523.92,2370.7 523.92,2299.08 623,2200 966,2200 1410.09,1755.91 1410.09,1262.89 1443,1229.98 v4(1477.49,1195.5)
CLK: J15.5 U4.J3 | length 516.9
  Top Layer w6: v3(929.81,3779.5) 929.81,3779.66 945.24,3795.09 U4.J3@945.24,3795.25
  Layer 1 w6: v2(560.57,3924.36) 816.64,3924.36 929.49,3811.51 929.49,3779.82 v3(929.81,3779.5)
  Bottom Layer w6: v2(560.57,3924.36) J15.5@607.54,3924.36
CMD: J15.3 U4.J4 | length 586.3
  Top Layer w6: v3(960.99,3779.5) U4.J4@976.74,3795.25
  Layer 1 w6: v2(560.57,4010.97) 765.03,4010.97 960.99,3815.01 v3(960.99,3779.5)
  Bottom Layer w6: v2(560.57,4010.97) J15.3@607.54,4010.97
CS: J23.1 SB1.2 U17.2 | length 1090.2
  Top Layer w10: v2(1355,4618) SB1.2@1355,4584 1385,4554 U17.2@1415.17,4554
  Bottom Layer w10: v2(1355,4618) 1427.3,4545.7 1427.3,4421.02 1497,4351.33 1497,3969 J23.1@1692,3774
CTS: U4.H14 U19.3 | length 1567.6
  Top Layer w6: U4.H14@1292.25,3826.75 v3(1303,3816)
  Layer 2 w6: v3(1303,3816) 1370.38,3816 1552,3634.38 1552,3363 1523,3334 v2(1458,3334)
  Bottom Layer w6: v2(1458,3334) 1458,2885.81 1602.41,2741.4 U19.3@1602.41,2542.99
CTS_5V: J27.3 U19.12 | length 253.7
  Top Layer w6: v2(1602.41,2401.41) J27.3@1768.72,2401.41
  Bottom Layer w6: U19.12@1602.41,2317.01 v2@1602.41,2404.41
CUR_SENSE: U4.A8 U16.1 | length 3301.2
  Top Layer w6: U4.A8@1102.72,4047.22 v3(1118.47,4062.97)
  Top Layer w12: v1(349.1,1503.81) U16.1@349.1,1568.32
  Layer 2 w6: v3(1118.47,4062.97) 1094,4038.5 1094,3465 v2(1128,3431)
  Layer 2 w12: v1(349.1,1503.81) 420,1574.71 v2@420,3127
  Bottom Layer w6: v2(418,3127) 418,3246 478,3306 1003,3306 1055,3358 v2(1128,3431)
D0: J15.7 U4.J1 | length 399.3
  Top Layer w6: v3(865.87,3779.5) 866.19,3779.5 881.93,3795.25 U4.J1@882.25,3795.25
  Layer 1 w6: v2(560.57,3837.74) 722.76,3837.74 781,3779.5 v3(865.87,3779.5)
  Bottom Layer w6: v2(560.57,3837.74) J15.7@607.54,3837.74
D1: J15.8 U4.K1 | length 410.1
  Top Layer w6: 849.57,3748.01 865.71,3748.01 v3(865.87,3748.17) ; v3@866.5,3748.01 U4.K1@882.25,3763.76
  Layer 1 w6: v2(560.57,3794.44) 692.57,3794.44 738.83,3748.17 v3(865.87,3748.17)
  Bottom Layer w6: v2(560.57,3794.44) J15.8@607.54,3794.44
D2: J15.1 U4.H2 | length 683.5
  Top Layer w6: v3(897.68,3811) 897.84,3811 913.59,3826.75 U4.H2@913.74,3826.75
  Layer 1 w6: v2(560.57,4097.58) 524,4061.02 524,3916 584,3856 758.36,3856 803.36,3811 v3(897.68,3811)
  Bottom Layer w6: v2(560.57,4097.58) J15.1@607.54,4097.58
D3: J15.2 U4.J2 | length 721.2
  Top Layer w6: v3(897.68,3779.5) 897.84,3779.5 913.59,3795.25 U4.J2@913.74,3795.25
  Layer 1 w6: v2(560.57,4054.28) 745.27,4054.28 976.89,3822.66 976.89,3772.92 967.58,3763.6 913.9,3763.6 898,3779.5 v3(897.68,3779.5)
  Bottom Layer w6: v2(560.57,4054.28) J15.2@607.54,4054.28
D9: J9.3 U9.D9 | length 1446
  Top Layer w6: U9.D9@1399.99,1118 v4(1414.5,1132.5)
  Layer 1 w8: J9.3@1231.91,2370.7 1516,2086.61 1516,1187 1494,1165 1446.99,1165 v4(1414.5,1132.5)
D10: U9.D10 U13.12 | length 486.7
  Top Layer w6: U9.D10@1431.49,1118 1431.49,1118.88 1444.09,1131.49 v4(1444.09,1132.37)
  Top Layer w8: v1(1348,1451) 1348.09,1451.09 U13.12@1456.47,1451.09
  Bottom Layer w8: v1@1347.69,1451 1347.69,1229.28 1444.09,1132.87 v4(1444.09,1132.37)
D10_1: U4.D10 U15.12 | length 1179.2
  Top Layer w6: U15.12@484.09,4223.53 504.53,4223.53 658,4377 v2(1160,4377) ; U4.D10@1165.71,3952.77 v3@1181.38,3968.44
  Layer 1 w6: v2(1160,4377) 1181.46,4355.54 1181.46,3968.56 v3(1181.38,3968.48)
F3: U9.F3 U13.15 | length 644.7
  Top Layer w6: v4(1119.41,1071.01) 1195.02,1071.01 U9.F3@1211.02,1055.01
  Top Layer w8: v1(1317.53,1384.16) U13.15@1428.91,1384.16
  Layer 1 w8: v4(1119.41,1071.01) 1187.5,1071.01 1317.53,1201.03 v1(1317.53,1384.16)
F3_1: U4.F3 U15.15 | length 1229.7
  Top Layer w6: v3(929.49,3905.49) U4.F3@945.24,3889.74
  Top Layer w8: U15.15@417.16,4251.09 v2@417.16,4285.16
  Layer 1 w8: v2(417,4285) 516,4384 1006,4384 1046,4344 1046,4022 v3(929.49,3905.49)
F11: U9.F11 U13.4 | length 308
  Top Layer w6: U9.F11@1462.98,1055.01 v4(1478.73,1070.76) ; v4(1494.57,1255) 1496.14,1255 1505.08,1263.94 1510.94,1263.94 1515.53,1268.53 U13.4@1515.53,1336.91
  Layer 2 w8: v4(1478.73,1070.76) 1478.73,1158.73 1494.57,1174.57 1494.57,1216.17 v4(1494.57,1255)
F11_1: U4.F11 U15.4 | length 1591.1
  Top Layer w6: v2(482,4396) 1147,4396 v2(1167,4416) ; U4.F11@1197.21,3889.74 1197.37,3889.74 1213.11,3905.49 v3(1213.27,3905.49)
  Top Layer w8: v2(337,4150) 351.47,4164.47 U15.4@369.91,4164.47
  Layer 1 w6: v2(337,4150) 368,4181 368,4282 v2(482,4396) ; v2(1167,4416) 1168,4416 1197.29,4386.71 1197.29,3921.47 v3(1213.27,3905.49)
F13: U9.F13 U13.13 | length 849.1
  Top Layer w6: U9.F13@1525.98,1055.01 v4(1541.72,1070.76)
  Top Layer w8: v1(1317.53,1423.53) U13.13@1428.91,1423.53
  Layer 1 w8: v4(1541.72,1070.76) 1573,1102.03 1573,1307 v1(1558,1322)
  Bottom Layer w8: v1(1317.53,1423.53) 1317.53,1469.53 1334,1486 1537,1486 1558,1465 v1(1558,1322)
F13_1: U4.F13 U15.13 | length 1284.7